# Altium PCB Fast_Servo.PCBDOC (part 3 of 11)
Units mm, origin at the board's own origin, x right, y up, seen from the top; angles counter-clockwise.
Board outline 162.48 x 100 mm, 6 copper layers (Top, GP1(GND), L3, L4, P3V3, Bot), stack 1.716 mm thick; 668 components, 491 nets, 2308 pads, 1133 vias.
Unrouted connection lines stored in the file: 2.
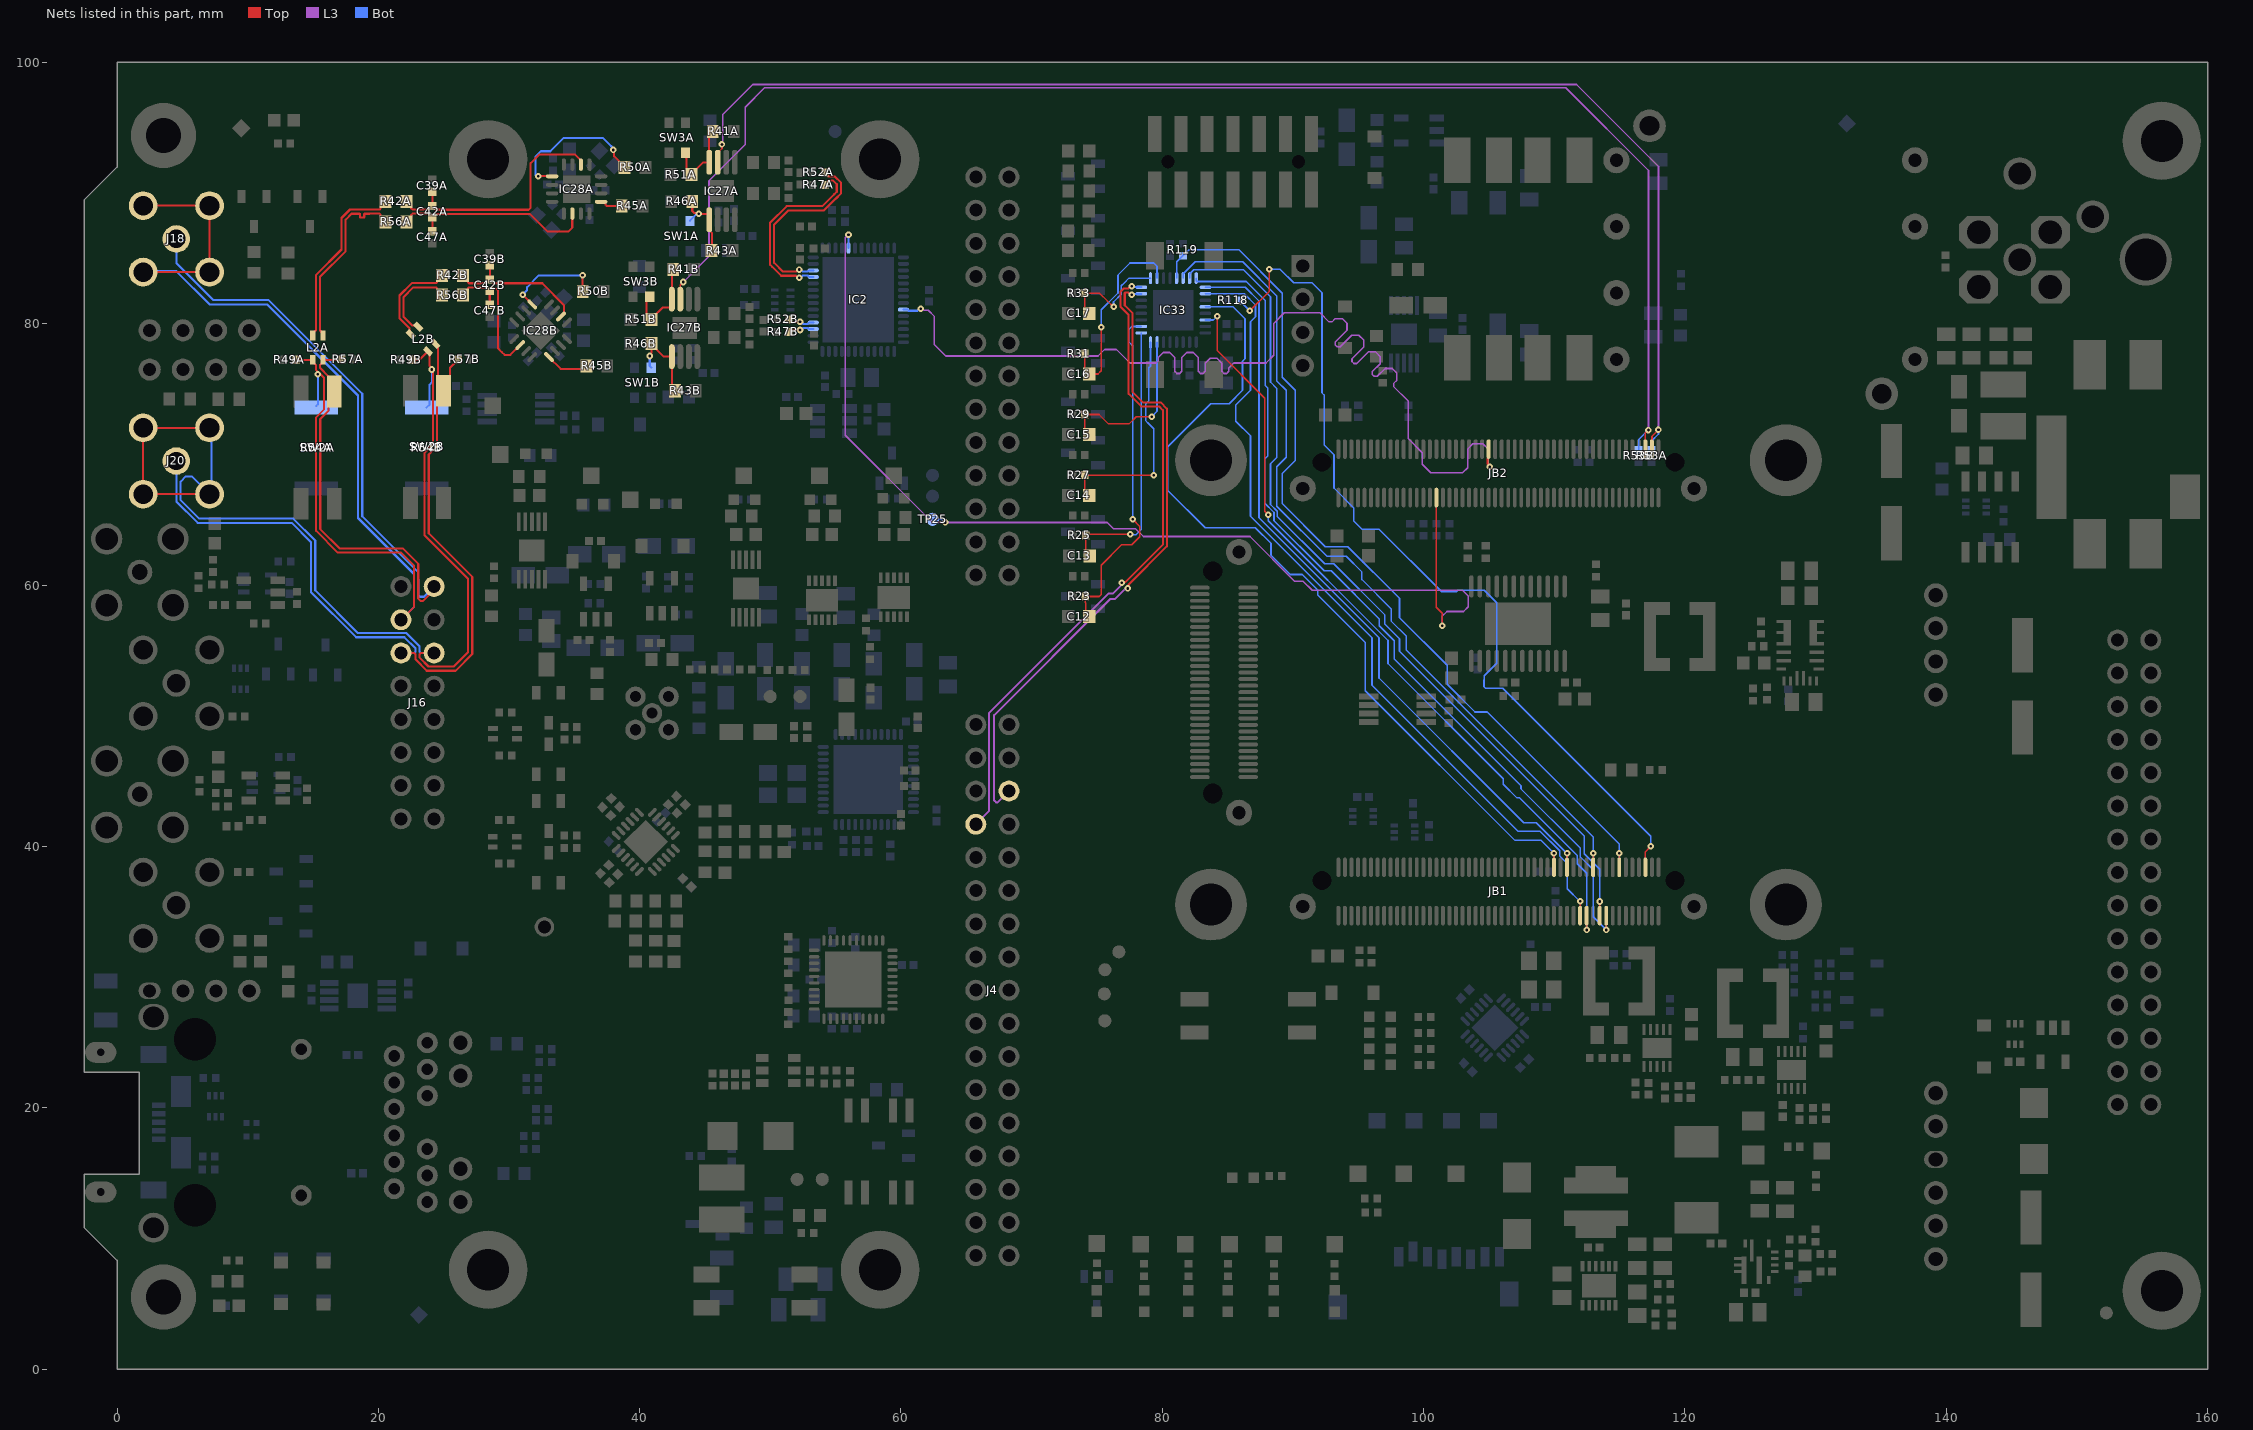
[diagram p7: the nets of this part, all layers, seen from the top]

## Part data (continued)
C22: library part CC0508_2.2UF_4V_20%_X7S_MURATA_LLA219C70G225M, "8 Terminals Low ESL Chip Multilayer Ceramic Capacitors for General Purpose", Case=0508, Manufacturer=MURATA, Manufacturer Part Number=LLA219C70G225MA01L, Tolerance=±20%, Voltage=4V, Author="CERN DEM BC", ComponentHeight=0.95mm, Component Type=Standard, CreateDate=07/07/2020, HelpURL=\\cern.ch\dfs\Applications\Altium\Datasheets\CC0508_X7S_MURATA_LLA219C70G225M.pdf, LatestRevisionDate=07/07/2020, Mounted=Yes, Part Description="8 Terminals Low ESL Chip Multilayer Ceramic Capacitors for General Purpose", Part Number=CC0508_2.2UF_4V_20%_X7S_MURATA_LLA219C70G225M, Pin Count=8, Sense=No, SMD=Yes, Socket=No, Status=None, TC=X7S
C25 C103 C104: library part CC0805_2.2UF_50V_10%_X7R, "Non-polarised capacitor", Case=0805, Manufacturer=GENERIC, Manufacturer1 ComponentHeight=1.40mm, Manufacturer1 Example=MURATA, Manufacturer1 Part Number=GRM21BR61H225KA73L, Tolerance=±10%, Voltage=50V, Author="CERN DEM JLC", Component Type=Standard, CreateDate=18/08/2014, HelpURL=\\cern.ch\dfs\Applications\Altium\Datasheets\CC0805_X7R_MURATA_GRM.pdf, LatestRevisionDate=18/08/2014, Manufacturer Part Number=CC0805_2.2UF_50V_10%_X7R, Mounted=Yes, Part Description="SMD Multilayer Chip Ceramic Capacitor", Part Number=CC0805_2.2UF_50V_10%_X7R, Pin Count=2, Sense=No, SMD=Yes, Socket=No, Status=Preferred, TC=X7R
C32 C34 C86 C89 C91 C93 C105 C128 C130 C131 C132 C187: library part CC0603_10UF_10V_10%_X5R, "Non-polarised capacitor", Case=0603, Manufacturer=GENERIC, Manufacturer1 ComponentHeight=0.8mm, Manufacturer1 Example=MURATA, Manufacturer1 Part Number=GRM188R61A106KE69D, Tolerance=±10%, Voltage=10V, Author="CERN DEM JLC", Component Type=Standard, HelpURL=\\cern.ch\dfs\Applications\Altium\Datasheets\CC0603_MURATA_GRM188R61A106KE69D.pdf, Manufacturer Part Number=CC0603_10UF_10V_10%_X5R, Mounted=Yes, Part Description="SMD Multilayer Chip Ceramic Capacitor", Part Number=CC0603_10UF_10V_10%_X5R, Pin Count=2, Sense=No, SMD=Yes, Socket=No, Status=None, TC=X5R
  C32 C34 C105 C128 C130 C131 C132 C187: CreateDate=31/01/2017, LatestRevisionDate=31/01/2017
  C86 C89 C91 C93: CreateDate=31-Jan-17, LatestRevisionDate=31-Jan-17
C39A C39B C47A C47B: library part CC0402_6.8PF_50V_0.1PF_NP0_JOHANSON_R07S, "Non-polarised capacitor", Case=0402, Manufacturer="JOHANSON TECHNOLOGY", Manufacturer Part Number=500R07S6R8BV4T, Tolerance=±0.1pF, Voltage=50V, Author="CERN DEM BC", ComponentHeight=0.61mm, Component Type=Standard, CreateDate=17-Nov-17, HelpURL=\\cern.ch\dfs\Applications\Altium\Datasheets\CC0402_NP0_JOHANSON_R07S.pdf, LatestRevisionDate=26-Sep-18, Mounted=Yes, Part Description="Ultra High-Q SMD Multilayer Capacitor", Part Number=CC0402_6.8PF_50V_0.1PF_NP0_JOHANSON_R07S, Pin Count=2, Sense=No, SMD=Yes, Socket=No, Status="Not Recommended", TC=C0G/NP0
C40A C40B C44A C44B: library part CC0603_2.2PF_50V_0.25PF_NP0, "Non-polarised capacitor", Case=0603, Manufacturer=GENERIC, Manufacturer1 ComponentHeight=0.87mm, Manufacturer1 Example=PHYCOMP, Manufacturer1 Part Number=223886715228, Tolerance=±0.25pF, Voltage=50V, Author="CERN DEM JLC", Component Type=Standard, CreateDate=03-Dec-07, HelpURL=\\cern.ch\dfs\Applications\Altium\Datasheets\CC0603_NP0_PHYCOMP.pdf, LatestRevisionDate=03-Dec-07, Manufacturer Part Number=CC0603_2.2PF_50V_0.25PF_NP0, Mounted=Yes, Part Description="SMD Multilayer Chip Ceramic Capacitor", Part Number=CC0603_2.2PF_50V_0.25PF_NP0, Pin Count=2, Sense=No, SMD=Yes, Socket=No, Status=Preferred, TC=C0G/NP0
C41A C41B C43A C43B C45A C45B C49A C49B: library part CC0402_100PF_50V_2%_C0G, "Non-polarised capacitor", Case=0402, Manufacturer=GENERIC, Manufacturer1 ComponentHeight=0.55mm, Manufacturer1 Example=KEMET, Manufacturer1 Part Number=C0402C101G5GAC, Manufacturer Part Number=CC0402_100PF_50V_5%_C0G, Tolerance=±2%, Voltage=50V, Author="CERN DEM BC", Component Type=Standard, CreateDate=15.06.2020, HelpURL="\\cern.ch\dfs\Applications\Altium\Datasheets\CC0402_C0G_KEMET_(Commercial Grade).pdf", LatestRevisionDate=15.06.2020, Mounted=Yes, Part Description="SMD Multilayer Chip Ceramic Capacitor", Part Number=CC0402_100PF_50V_2%_C0G, Pin Count=2, Sense=No, SMD=Yes, Socket=No, Status=Preferred, TC=C0G/NP0
C42A C42B: library part CC0402_1PF_50V_0.25PF_C0G, "Non-polarised capacitor", Case=0402, Manufacturer=GENERIC, Manufacturer1 ComponentHeight=0.55mm, Manufacturer1 Example=KEMET, Manufacturer1 Part Number=C0402C109C5GACTU, Tolerance=±0.25pF, Voltage=50V, Author="CERN DEM JLC", Component Type=Standard, CreateDate=03-Dec-07, HelpURL="\\cern.ch\dfs\Applications\Altium\Datasheets\CC0805_C0G_KEMET_(Commercial Grade).pdf", LatestRevisionDate=22-Apr-15, Manufacturer Part Number=CC0402_1PF_50V_0.25PF_C0G, Mounted=Yes, Part Description="SMD Multilayer Chip Ceramic Capacitor", Part Number=CC0402_1PF_50V_0.25PF_C0G, Pin Count=2, Sense=No, SMD=Yes, Socket=No, Status=Preferred, TC=C0G/NP0
C53 C55 C61 C63 C200: library part CC0603_33PF_50V_5%_NP0, "Non-polarised capacitor", Case=0603, Manufacturer=GENERIC, Manufacturer1 ComponentHeight=0.87mm, Manufacturer1 Example=PHYCOMP, Manufacturer1 Part Number=223886715339, Tolerance=±5%, Voltage=50V, Author="CERN DEM JLC", Component Type=Standard, HelpURL=\\cern.ch\dfs\Applications\Altium\Datasheets\CC0603_NP0_PHYCOMP.pdf, Manufacturer Part Number=CC0603_33PF_50V_5%_NP0, Mounted=Yes, Part Description="SMD Multilayer Chip Ceramic Capacitor", Part Number=CC0603_33PF_50V_5%_NP0, Pin Count=2, Sense=No, SMD=Yes, Socket=No, Status=Preferred, TC=C0G/NP0
  C53 C55 C61 C63: CreateDate=03-Dec-07, LatestRevisionDate=03-Dec-07
  C200: CreateDate=03.12.2007, LatestRevisionDate=03.12.2007
C69 C72 C74 C76 C82 C83: library part CC0603_NO-VALUE, "Non-polarised capacitor", Case=0603, Manufacturer1 ComponentHeight=0.9mm, Author="CERN DEM MR", Component Type=Standard, CreateDate=22.11.2016, HelpURL=Undefined, LatestRevisionDate=22.11.2016, Manufacturer=Undefined, Manufacturer Part Number=CC0603_NO-VALUE, Mounted=No, Part Description="Reserved Footprint For 0603(1608) Chip Ceramic Capacitor", Part Number=CC0603_NO-VALUE, Pin Count=2, Sense=No, SMD=Yes, Socket=No, Status=None
C81 C124 C125: library part CAE830-620_220UF_16V_20%, "Polarised capacitor", Case=E, Manufacturer=PANASONIC, Manufacturer Part Number=EEEFK1C221AP, Tolerance=±20%, Voltage=16V, Author="CERN DEM JLC", ComponentHeight=6.2mm, Component Type=Standard, CreateDate=03.12.2007, HelpURL=\\cern.ch\dfs\Applications\Altium\Datasheets\CAE_PANASONIC_FK.pdf, LatestRevisionDate=05.11.2014, Mounted=Yes, Part Description="Aluminum Electrolytic SMT Capacitor", Part Number=CAE830-620_220UF_16V_20%, Pin Count=2, Sense=No, SMD=Yes, Socket=No, Status="Not Recommended"
C100 C101 C109 C135 C138 C139 C143 C147 C165 C166 C169 C171 C179 C181 C182: library part CTE3216-18_10UF_16V_20%_AVX_TCJ, "Polarised capacitor", Case=A, Manufacturer=AVX, Manufacturer Part Number=TCJA106M016R0200, Tolerance=±20%, Voltage=16V, Author="CERN DEM JLC", ComponentHeight=1.8mm, Component Type=Standard, CreateDate=29.03.2012, HelpURL=\\cern.ch\dfs\Applications\Altium\Datasheets\CTE_AVX_TCJ.pdf, LatestRevisionDate=29.03.2012, Mounted=Yes, Part Description="ESR 0R200 Tantalum Solid Electrolytic Chip Capacitor with Conductive Polymer Electrode", Part Number=CTE3216-18_10UF_16V_20%_AVX_TCJ, Pin Count=2, Sense=No, SMD=Yes, Socket=No, Status=Preferred
C106 C107 C108 C111 C112 C116 C118 C119 C120 C126 C134 C142 C146 C163 C164 C167 C168 C172 C173 C174 C175 C176 C177 C178 C192 C193 C199: library part CC0805_22UF_16V_10%_X5R, "Non-polarised capacitor", Case=0805, Manufacturer=GENERIC, Manufacturer1 ComponentHeight=1.35mm, Manufacturer1 Example=TDK, Manufacturer1 Part Number=C2012X5R1C226KT, Tolerance=±10%, Voltage=16V, Author="CERN DEM JLC", Component Type=Standard, HelpURL=\\cern.ch\dfs\Applications\Altium\Datasheets\CC0805_X5R_TDK_C.pdf, Manufacturer Part Number=CC0805_22UF_16V_10%_X5R, Mounted=Yes, Part Description="SMD Multilayer Chip Ceramic Capacitor", Part Number=CC0805_22UF_16V_10%_X5R, Pin Count=2, Sense=No, SMD=Yes, Socket=No, Status=Preferred, TC=X5R
  C106 C107 C108 C111 C112 C116 C120 C126 C134 C142 C146 C163 C164 C167 C168 C172 C173 C174 C175 C176 C177 C178 C192 C193 C199: CreateDate=25.10.2012, LatestRevisionDate=25.10.2012
  C118 C119: CreateDate=25-Oct-12, LatestRevisionDate=25-Oct-12
C110 C136 C144 C148 C155 C162: library part CTE3216-18_22UF_10V_10%, "Polarised capacitor", Case=A, Manufacturer=GENERIC, Manufacturer1 ComponentHeight=1.8mm, Manufacturer1 Example=AVX, Manufacturer1 Part Number=TAJA226K010R, Tolerance=±10%, Voltage=10V, Author="CERN DEM JLC", Component Type=Standard, HelpURL=\\cern.ch\dfs\Applications\Altium\Datasheets\CTE_AVX_TAJ.pdf, Manufacturer Part Number=CTE3216-18_22UF_10V_10%, Mounted=Yes, Part Description="Solid Tantalum Chip Capacitor", Part Number=CTE3216-18_22UF_10V_10%, Pin Count=2, Sense=No, SMD=Yes, Socket=No, Status=Preferred
  C110 C136 C144 C148: CreateDate=03/12/2007, LatestRevisionDate=03/12/2007
  C155 C162: CreateDate=03.12.2007, LatestRevisionDate=03.12.2007
C114 C184 C185 C194 C195 C201: library part CC0402_1.5NF_50V_5%_C0G, "Non-polarised capacitor", Case=0402, Manufacturer=GENERIC, Manufacturer1 ComponentHeight=0.55mm, Manufacturer1 Example=KEMET, Manufacturer1 Part Number=C0402C152J5GACTU, Tolerance=±5%, Voltage=50V, Author="CERN DEM BC", Component Type=Standard, CreateDate=02.09.2019, HelpURL="\\cern.ch\dfs\Applications\Altium\Datasheets\CC0402_C0G_KEMET_(Commercial Grade).pdf", LatestRevisionDate=02.09.2019, Manufacturer Part Number=CC0402_1.5NF_50V_5%_C0G, Mounted=Yes, Part Description="SMD Multilayer Chip Ceramic Capacitor", Part Number=CC0402_1.5NF_50V_5%_C0G, Pin Count=2, Sense=No, SMD=Yes, Socket=No, Status=Preferred, TC=C0G/NP0
C122 C123 C127: library part CAP_SMD_1206_4.7n_500V, "Non-polarised capacitor", Case=1206, Manufacturer=GENERIC, Manufacturer1 ComponentHeight=1.7mm, Manufacturer1 Example=KEMET, Manufacturer1 Part Number=C1206C472KCRACTU, Manufacturer Part Number=CC1206_4.7NF_500V_10%_X7R, Tolerance=±10%, Voltage=500V, Author=GK, Component Type=Standard, CreateDate=2007-12-03, HelpURL=\\cern.ch\dfs\Applications\Altium\Datasheets\CC1206_X7R_VISHAY_VJ.pdf, LatestRevisionDate=2007-12-03, Mounted=Yes, Part Description="SMD Multilayer Chip Ceramic Capacitor", Part Number=CC1206_4.7NF_500V_10%_X7R, Pin Count=2, SMD=Yes, Socket=No, Status=Preferred, Table="Capacitors SMD", TC=X7R
C186 C188 C196 C198: library part CC0402_150PF_50V_5%_C0G, "Non-polarised capacitor", Case=0402, Manufacturer=GENERIC, Manufacturer1 ComponentHeight=0.55mm, Manufacturer1 Example=KEMET, Manufacturer1 Part Number=C0402C151J5GACTU, Tolerance=±5%, Voltage=50V, Author="CERN DEM JLC", Component Type=Standard, CreateDate=03.12.2007, HelpURL="\\cern.ch\dfs\Applications\Altium\Datasheets\CC0402_C0G_KEMET_(Commercial Grade).pdf", LatestRevisionDate=22.04.2015, Manufacturer Part Number=CC0402_150PF_50V_5%_C0G, Mounted=Yes, Part Description="SMD Multilayer Chip Ceramic Capacitor", Part Number=CC0402_150PF_50V_5%_C0G, Pin Count=2, Sense=No, SMD=Yes, Socket=No, Status=Preferred, TC=C0G/NP0
D1 D2 D3 D4 D5 D6 D7 D8 D9 D10 D11 D12: "Serial Diode", Case=SOT23-3, Manufacturer="NXP SEMICONDUCTORS", Power=250mW, Voltage=75V, Author="CERN DEM JMW", Bonding=No, ComponentHeight=1.1mm, Component Type=Standard, CreateDate=2008-11-21, Device=BAV199, HelpURL=\\cern.ch\dfs\Applications\Altium\Datasheets\BAV199.pdf, LatestRevisionDate=2008-11-21, Manufacturer Part Number=BAV199, Mounted=Yes, PackageDescription="SOT23 3-Leads, Pitch 0.95mm - Body 1.4x3mm, IPC Medium Density", Part Description="Low-Leakage Double Diode", Part Number=BAV199, Pin Count=3, PressFit=No, Sense=No, SMD=Yes, Socket=No
D13 D16 D17 D21 D22: Manufacturer="ON SEMICONDUCTOR", Voltage=5.5V, Author="CERN DEM JLC", Bonding=No, Component Type=Standard, ComponentHeight=1.75mm, CreateDate=05.12.2012, Device=NUP4114UPXV6T1G, HelpURL=\\cern.ch\dfs\Applications\Altium\Datasheets\NUP4114UPXV6T1G.pdf, LatestRevisionDate=05.12.2012, Manufacturer Part Number=NUP4114UPXV6T1G, Mounted=Yes, PackageDescription="SOTFL (SOT666, SOT563,), 0.50mm, Pitch; 6 Pin, 1.20mm W X 1.60mm L X 0.60mm H Body, IPC Medium Density", Part Description="ESD Protection Diodes Array (8kV) with Low Clamping Voltage", Part Number=NUP4114UPXV6T1G, Pin Count=8, PressFit=No, Sense=No, SMD=Yes, Socket=No
D14 D15 D19 D20 D24 D26 D27 D28 D29 D30 D31 D32: "Schottky Diode", Case=SOD-123FL, Manufacturer="NXP SEMICONDUCTORS", Power=2A, Voltage=60V, Author="CERN DEM JMW", Bonding=No, Component Type=Standard, ComponentHeight=1.1mm, CreateDate=19.06.2014, Device=PMEG6020ER, HelpURL=\\cern.ch\dfs\Applications\Altium\Datasheets\PMEG6020ER.pdf, LatestRevisionDate=19.06.2014, Manufacturer Part Number=PMEG6020ER, Mounted=Yes, PackageDescription="SODFL Diode (SOD123W); 2.60mm W X 1.70mm L X 1.10mm H body, IPC Medium Density", Part Description="MEGA Schottky Barrier Rectifier", Part Number=PMEG6020ER, Pin Count=2, PressFit=No, Sense=No, SMD=Yes, Socket=No
D18: "Zener Diode", Case=DO-214AA, Manufacturer="FAIRCHILD SEMICONDUCTOR", Power=600W, Voltage=60V, Author="CERN DEM JLC", Bonding=No, ComponentHeight=2.65mm, Component Type=Standard, CreateDate=30.06.2008, Device=SMBJ60A, HelpURL=\\cern.ch\dfs\Applications\Altium\Datasheets\SMBJ.pdf, LatestRevisionDate=19.12.2011, Manufacturer Part Number=SMBJ60A, Mounted=Yes, PackageDescription="DO-214-AA/SMB Diode, Molded Body; 5.34mm L X 3.625mm W X 2.65mm H, IPC Medium Density", Part Description="Uni-Directional Transient Voltage Suppressor Diode", Part Number=SMBJ60A, Pin Count=2, PressFit=No, Sense=No, SMD=Yes, Socket=No
D23: "Zener Diode", Case=DO-214AA, Manufacturer="FAIRCHILD SEMICONDUCTOR", Power=600W, Voltage=15V, Author="CERN DEM JLC", Bonding=No, ComponentHeight=2.65mm, Component Type=Standard, CreateDate=08.12.2008, Device=SMBJ15A, HelpURL=\\cern.ch\dfs\Applications\Altium\Datasheets\SMBJ.pdf, LatestRevisionDate=19.12.2011, Manufacturer Part Number=SMBJ15A, Mounted=Yes, PackageDescription="DO-214-AA/SMB Diode, Molded Body; 5.34mm L X 3.625mm W X 2.65mm H, IPC Medium Density", Part Description="Uni-Directional Transient Voltage Suppressor Diode", Part Number=SMBJ15A, Pin Count=2, PressFit=No, Sense=No, SMD=Yes, Socket=No
D25: library part SMBJ5V0A, "Zener Diode", Case=DO-214AA, Manufacturer=DIODES, Power=600W, Voltage=5V, Author=GK, Bonding=No, Component Type=Standard, ComponentHeight=2.65mm, CreateDate=08-Dec-08, Device=SMBJ5.0A, HelpURL=\\cern.ch\dfs\Applications\Altium\Datasheets\SMBJ.pdf, LatestRevisionDate=19-Dec-11, Manufacturer Part Number=SMBJ5.0A, Mounted=Yes, PackageDescription="DO-214-AA/SMB Diode, Molded Body; 5.34mm L X 3.625mm W X 2.65mm H, IPC Medium Density", Part Description="Uni-Directional Transient Voltage Suppressor Diode", Part Number=SMBJ5.0A, Pin Count=2, PressFit=No, Sense=No, SMD=Yes, Socket=No
FL1: library part FIL_MURATA_BNX022-01L, "Block Type EMIFIL (LC Combined)", Manufacturer=MURATA, Manufacturer Part Number=BNX022-01L, Resistance=0.5R, Author="CERN DEM JLC", ComponentHeight=3.3mm, Component Type=Standard, CreateDate=10.10.2012, HelpURL=\\cern.ch\dfs\Applications\Altium\Datasheets\FIL_MURATA_BNX022-01L.pdf, LatestRevisionDate=10.10.2012, Mounted=Yes, Part Description="Block Type EMIFIL (LC Combined) SMD Type, BNX02* Series", Part Number=FIL_MURATA_BNX022-01L, Pin Count=2, Sense=No, SMD=Yes, Socket=No, Status=None
FTG1: library part FIDUCIAL_TARGET_C100-200, "Fiducial Target", Author="CERN DEM JLC", ComponentHeight=0mm, Component Type="Standard (No BOM)", CreateDate=09.02.2010, Family=Fiducial, HelpURL=Undefined, LatestRevisionDate=04.04.2012, Mounted=No, PackageDescription="Round Fiducial Target, Top Layer, 1.0mm, Top Solder 2.0mm, Keepout =2.0mm", Part Description="Round Fiducial Target, Top Layer, 1.0mm, Top Solder 2.0mm, Keepout =2.0mm", Part Number=FIDUCIAL_TARGET_C100-200, Pin Count=1, Sense=No, SMD=Yes, Socket=No, Status=None
FTG2 FTG3 FTG4: library part FIDUCIAL_TARGET_S100-200, "Fiducial Target", Author="CERN DEM JLC", ComponentHeight=0mm, Component Type="Standard (No BOM)", CreateDate=09.02.2010, Family=Fiducial, HelpURL=Undefined, LatestRevisionDate=04.04.2012, Mounted=No, PackageDescription="Square Fiducial Target, Top Layer, 1.0mm, Top Solder 2.0mm, Keepout =2.0mm", Part Description="Square Fiducial Target, Top Layer, 1.0mm, Top Solder 2.0mm, Keepout =2.0mm", Part Number=FIDUCIAL_TARGET_S100-200, Pin Count=1, Sense=No, SMD=Yes, Socket=No, Status=None
IC1: "One Channel, Current-Limited, Power-Distribution Switches", Case=SSOP8, Manufacturer="TEXAS INSTRUMENTS", Author="CERN DEM BC", Bonding=No, ComponentHeight=1.1mm, Component Type=Standard, CreateDate=06/07/2020, Device=TPS2051BDGN, HelpURL=\\cern.ch\dfs\Applications\Altium\Datasheets\TPS2051BDGN.pdf, LatestRevisionDate=06/07/2020, Manufacturer Part Number=TPS2051BDGN, Mounted=Yes, PackageDescription="SOP, 0.65mm Pitch; 8 Pin, 3.00mm W X 3.00mm L X 1.10mm H body (w/Thermal Tab 1.57 X 1.89mm), IPC Medium Density", Part Description="One Channel, Current-Limited (500mA), Power-Distribution Switches", Part Number=TPS2051BDGN, Pin Count=8, PressFit=No, Sense=No, SMD=Yes, Socket=No
IC2: "16-Bit, 125Msps Low Power Dual ADCs", Case=QFN52, Manufacturer="ANALOG DEVICES", Author="CERN DEM BC", Bonding=No, ComponentHeight=0.8mm, Component Type=Standard, CreateDate=06/07/2020, Device=LTC2195CUKG, HelpURL=\\cern.ch\dfs\Applications\Altium\Datasheets\LTC2195CUKG.pdf, LatestRevisionDate=06/07/2020, Manufacturer Part Number=LTC2195CUKG, Mounted=Yes, PackageDescription="QFN, 0.50mm Pitch, Rect.; 12 pin X 14 Pin, 7.00mm L X 8.00mm W X 0.80mm H body (w/Thermal Tab 6.55 X 5.50mm), IPC Medium Density", Part Description="16-Bit, 125Msps Low Power Dual ADCs", Part Number=LTC2195CUKG, Pin Count=53, PressFit=No, Sense=No, SMD=Yes, Socket=No
IC3: "Ultralow Noise Drivers For Low Voltage ADCs", Case=QFN24, Manufacturer="ANALOG DEVICES", Author="CERN DEM MR", Bonding=No, ComponentHeight=0.8mm, Component Type=Standard, CreateDate=23/11/2016, Device=ADA4930-2YCPZ, HelpURL=\\cern.ch\dfs\Applications\Altium\Datasheets\ADA4930-2YCPZ.pdf, LatestRevisionDate=23/11/2016, Manufacturer Part Number=ADA4930-2YCPZ, Mounted=Yes, PackageDescription="QFN, 0.50mm Pitch, Square; 24 Pin, 4.00mm L X 4.00mm W X 0.80mm H body (w/Thermal Tab 2.40 X 2.40mm), IPC Medium Density", Part Description="Ultralow Noise Drivers For Low Voltage ADCs", Part Number=ADA4930-2YCPZ, Pin Count=25, PressFit=No, Sense=No, SMD=Yes, Socket=No
IC4 IC29: "Single Bus Buffer Gate With 3-State Output", Case=SOT23-5, Manufacturer=DIODES, Author=GK, Bonding=No, Component Type=Standard, ComponentHeight=1.45mm, CreateDate=18.05.2016, Device=74LVC1G125W5-7, HelpURL=\\cern.ch\dfs\Applications\Altium\Datasheets\SN74AHC1G125DBV.pdf, LatestRevisionDate=18.05.2016, Manufacturer Part Number=74LVC1G125W5-7, Mounted=Yes, PackageDescription="SOT, 0.95mm Pitch; 5 Pin, 1.60mm W X 2.90mm L X 1.45mm H body, IPC Medium Density", Part Description="Single Bus Buffer Gate With 3-State Output", Part Number=74LVC1G125W5-7, Pin Count=5, PressFit=No, Sense=No, SMD=Yes, Socket=No
IC5 IC30: "Single Schmitt-Trigger Inverter", Case=SOT353, Manufacturer="NXP SEMICONDUCTORS", Author="CERN DEM JLC", Bonding=No, Component Type=Standard, ComponentHeight=1.1mm, CreateDate=04.07.2012, Device=74LVC1G14GW, HelpURL=\\cern.ch\dfs\Applications\Altium\Datasheets\74LVC1G14GW.pdf, LatestRevisionDate=04.07.2012, Manufacturer Part Number=74LVC1G14GW, Mounted=Yes, PackageDescription="SOT353, SC70-5, 0.65mm Pitch; 5 Pin, 1.25mm W X 2.05mm L X 1.10mm H body, IPC Medium Density", Part Description="Single Schmitt-trigger inverter", Part Number=74LVC1G14GW, Pin Count=4, PressFit=No, Sense=No, SMD=Yes, Socket=No
IC6: "SDIO Port Expander With Voltage-Level Translation", Case=QFN24, Manufacturer="TEXAS INSTRUMENTS", Author="CERN DEM JLC", Bonding=No, ComponentHeight=0.8mm, Component Type=Standard, CreateDate=19-Nov-14, Device=TXS02612RTWR, HelpURL=\\cern.ch\dfs\Applications\Altium\Datasheets\TXS02612RTWR.pdf, LatestRevisionDate=19-Nov-14, Manufacturer Part Number=TXS02612RTWR, Mounted=Yes, PackageDescription="QFN, 0.50mm Pitch, Square; 6 Pin X 6 Pin, 4mm X 4mm Body (w/Thermal Tab 2.55 X 2.55 mm), IPC Medium Density", Part Description="SDIO Port Expander With Voltage-Level Translation", Part Number=TXS02612RTWR, Pin Count=25, PressFit=No, Sense=No, SMD=Yes, Socket=No
IC7: "1.7V-5.5V, 2K I2C Serial EEPROM With EUI-48 Node Identity", Case=SOT23-5, Manufacturer="MICROCHIP TECHNOLOGY", Author="CERN DEM MR", Bonding=No, ComponentHeight=1.45mm, Component Type=Standard, CreateDate=31.03.2016, Device=24AA02E48T-I/OT, HelpURL=\\cern.ch\dfs\Applications\Altium\Datasheets\24AA02E48T-I-OT.pdf, LatestRevisionDate=31.03.2016, Manufacturer Part Number=24AA02E48T-I/OT, Mounted=Yes, PackageDescription="SOT, 0.95mm pitch; 5 pin, 1.60mm W X 2.90mm L X 1.45mm H body, IPC Medium Density", Part Description="1.7V-5.5V, 2K I2C Serial EEPROM With EUI-48 Node Identity", Part Number=24AA02E48T-I/OT, Pin Count=5, PressFit=No, Sense=No, SMD=Yes, Socket=No
IC8 IC17 IC23: "200mA, Low Noise, Low Dropout Negative Micropower Regulator", Case=SOT23-5, Manufacturer="LINEAR TECHNOLOGY", Author="CERN DEM JLC", Bonding=No, ComponentHeight=1mm, Component Type=Standard, CreateDate=05.05.2009, Device=LT1964ES5-SD#TRMPBF, HelpURL=\\cern.ch\dfs\Applications\Altium\Datasheets\LT1964ES5-SD#TRMPBF.pdf, LatestRevisionDate=05.05.2009, Manufacturer Part Number=LT1964ES5-SD#TRMPBF, Mounted=Yes, PackageDescription="SOT23, 0.95mm pitch; 5 pin, 1.75mm W X 3.00mm L, IPC Medium Density", Part Description="-1.22V to -20V, 200mA, Low Noise, Low Dropout Negative Micropower Regulator", Part Number=LT1964ES5-SD#TRMPBF, Pin Count=5, PressFit=No, Sense=No, SMD=Yes, Socket=No
IC9 IC19 IC21: "20V, 200mA, Ultralow Noise, Ultrahigh PSRR RF Linear Regulator", Case=MSOP10, Manufacturer="LINEAR TECHNOLOGY", Author="CERN DEM MR", Bonding=No, ComponentHeight=1.1mm, Component Type=Standard, CreateDate=09.06.2016, Device=LT3042EMSE#PBF, HelpURL=\\cern.ch\dfs\Applications\Altium\Datasheets\LT3042EMSE#PBF.pdf, LatestRevisionDate=09.06.2016, Manufacturer Part Number=LT3042EMSE#PBF, Mounted=Yes, PackageDescription="SOP, 0.50mm, Pitch; 10 pin, 3.00mm W X 3.00mm L X 1.10mm H body (w/thermal tab  1.68 X 1.98 mm), IPC Medium Density", Part Description="20V, 200mA, Ultralow Noise, Ultrahigh PSRR RF Linear Regulator", Part Number=LT3042EMSE#PBF, Pin Count=11, PressFit=No, Sense=No, SMD=Yes, Socket=No
IC10: "2.8V to 5.5V Input, 4A, Power Module Synchronous Step-Down Converter with Integrated Inductor", Case=QFN20, Manufacturer="MPS (MONOLITIC  POWER SYSTEMS)", Author="CERN DEM BC", Bonding=No, Component Type=Standard, ComponentHeight=1.65mm, CreateDate=23.11.2020, Device=MPM3840GQV, HelpURL=\\cern.ch\dfs\Applications\Altium\Datasheets\MPM3840GQV.pdf, LatestRevisionDate=23.11.2020, Manufacturer Part Number=MPM3840GQV, Mounted=Yes, PackageDescription="MPS QFN-20 Case, 0.50mm Pitch, Rect.; 18 Pin, 3.00mm L X 5.00mm W X 1.65mm H body, (w/Thermal Tab x2)", Part Description="2.8V to 5.5V Input, 4A, Power Module Synchronous Step-Down Converter with Integrated Inductor", Part Number=MPM3840GQV, Pin Count=20, PressFit=No, Sense=No, SMD=Yes, Socket=No
IC11: "4.5V to 28V Input, 6A Synchronous Buck Converter", Manufacturer="TEXAS INSTRUMENTS", Author="CERN DEM BC", Bonding=No, ComponentHeight=1mm, Component Type=Standard, CreateDate=06/07/2020, Device=TPS56637RPA, HelpURL=\\cern.ch\dfs\Applications\Altium\Datasheets\TPS56637RPA.pdf, LatestRevisionDate=06/07/2020, Manufacturer Part Number=TPS56637RPA, Mounted=Yes, PackageDescription="TEXAS Case Style RPA0010A, QFN, 0.50mm Pitch; 10 Pin, 3.00mm W X3.00mm L X 1.00mm H body", Part Description="4.5V to 28V Input, 6A Synchronous Buck Converter", Part Number=TPS56637RPA, Pin Count=10, PressFit=No, Sense=No, SMD=Yes, Socket=No
IC12: library part AG5300, "Power-over-Ethernet Plus (POE+) Module", Manufacturer=SILVERTEL, Author="CERN DEM JLC", Bonding=No, Component Type=Standard, ComponentHeight=14mm, CreateDate=20.03.2018, Device=AG5300/AG5412, HelpURL=\\cern.ch\dfs\Applications\Altium\Datasheets\AG5300.pdf, LatestRevisionDate=20.03.2018, Manufacturer Part Number=AG5300/AG5412, Mounted=Yes, PackageDescription="Power-over-Ethernet Plus (POE+) Module, Body L 57.3mm x W 18mm x H 14mm", Part Description="12V 30W Power-over-Ethernet Plus (POE+)", Part Number=AG5300/AG5412, Pin Count=10, PressFit=No, Sense=No, SMD=No, Socket=No
IC13 IC14: "Single Optocoupler", Case=SOIC4, Manufacturer=VISHAY, Part Number=TCMD1000-217-500E, Author=GK, Bonding=No, Component Type=Standard, ComponentHeight=2.42mm, CreateDate=11.11.2014, Device=TCMD1000, HelpURL=\\cern.ch\dfs\Applications\Altium\Datasheets\ACPL-217-500E.pdf, LatestRevisionDate=11.11.2014, Manufacturer Part Number=TCMD1000, Mounted=Yes, PackageDescription="SOIC, 1.27mm, pitch; 4 pin, 2.60mm W X 4.40mm L X 2.42mm H body, IPC Medium Density", Part Description="DC Input, Half-Pitch Phototransistor Optocoupler", Pin Count=4, PressFit=No, Sense=No, SMD=Yes, Socket=No, Status="Not Recommended"
IC15: "4.5V to 60V, 1A High-Efficiency, Synchronous, Inverting Output DC-DC Converters", Case=SON12, Manufacturer=MAXIM, Author="CERN DEM HF", Bonding=No, Component Type=Standard, ComponentHeight=0.8mm, CreateDate=22.10.2021, Device=MAX17577ATC+, HelpURL=\\cern.ch\dfs\Applications\Altium\Datasheets\MAX17577ATC+.pdf, LatestRevisionDate=22.10.2021, Manufacturer Part Number=MAX17577ATC+, Mounted=Yes, PackageDescription="SON, 0.50mm Pitch, 12-Pin, 3.00mm W  X 3.00mm L X 0.80mm H body, (w/Thermal Tab 1.80 X 2.60mm), IPC Medium Density", Part Description="4.5V to 60V, 1A High-Efficiency, Synchronous, Inverting Output DC-DC Converters", Part Number=MAX17577ATC+, Pin Count=13, PressFit=No, Sense=No, SMD=Yes, Socket=No
IC16 IC18: "20V, 500mA, Ultralow Noise, Ultrahigh PSRR Linear Regulator", Case=SON10, Manufacturer="LINEAR TECHNOLOGY", Author="CERN DEM JLC", Bonding=No, ComponentHeight=0.8mm, Component Type=Standard, CreateDate=07/12/2016, Device=LT3045EDD#PBF, HelpURL=\\cern.ch\dfs\Applications\Altium\Datasheets\LT3045EDD#PBF.pdf, LatestRevisionDate=07/12/2016, Manufacturer Part Number=LT3045EDD#PBF, Mounted=Yes, PackageDescription="SON, 0.50mm Pitch; 10 Pin, 3.00mm W X 3.00mm L X 0.80mm H body (w/Thermal Tab 1.75 X 2.48 mm), IPC Medium Density", Part Description="20V, 500mA, Ultralow Noise, Ultrahigh PSRR Linear Regulator", Part Number=LT3045EDD#PBF, Pin Count=11, PressFit=No, Sense=No, SMD=Yes, Socket=No
IC20: "Low-Jitter, 10 or 4-Output, Any-Frequency, Any-Output Clock Generator", Case=QFN44, Manufacturer="SILICON LABS", Author="CERN DEM JLC", Bonding=No, ComponentHeight=0.9mm, Component Type=Standard, CreateDate=14-Dec-17, Device=SI5340B-D-GM, HelpURL=\\cern.ch\dfs\Applications\Altium\Datasheets\SI5340B-D-GM.pdf, LatestRevisionDate=14-Dec-17, Manufacturer Part Number=SI5340B-D-GM, Mounted=Yes, PackageDescription="QFN,0.50mm Pitch, Square; 44 Pin, 7.00mm L X 7.00mm W X 0.90mm H Body (W/Thermal Tab 5.3mm X 5.3mm), IPC Medium Density", Part Description="Low-Jitter, 10 or 4-Output, Any-Frequency, Any-Output Clock Generator", Part Number=SI5340B-D-GM, Pin Count=45, PressFit=No, Sense=No, SMD=Yes, Socket=No
IC22: library part DC/DC_CC6-1212DF-E, "CONV DC/DC 6W DUAL 12V +-12V PCB", Manufacturer="TDK-Lambda Americas Inc.", Author=GK, Bonding=No, ComponentHeight=10.45mm, Component Type=Standard, CreateDate=17.12.2016, Device=CC6-1212DF-E, LatestRevisionDate=17.12.2016, Manufacturer Part Number=CC6-1212DF-E, Mounted=Yes, PackageDescription="CC6 Series, Body 0.900 x 0.831 x 0.335, Regulated", Part Description="CONV DC/DC 6W DUAL 12V +-12V PCB", Part Number=CC6-1212DF-E, Pin Count=7, PressFit=No, Sense=No, SMD=No, Socket=No
IC24 IC25: library part PM_FAN8060, "2.5 to 5.5 V 1 A 1.2 MHz Step-Down DC/DC", Case=SON10, Manufacturer="ON SEMICONDUCTOR", Author=GK, Bonding=No, Component Type=Standard, ComponentHeight=0.8mm, CreateDate=22.10.2021, Device=FAN8060EMPX, HelpURL=\\cern.ch\dfs\Applications\Altium\Datasheets\FAN5354MPX.pdf, LatestRevisionDate=22.10.2021, Manufacturer Part Number=FAN8060EMPX, Mounted=Yes, PackageDescription="SON, 10-Leads, Body 3,00x3,00mm, Pitch 0,50mm, Thermal Pad 2,25x1,55mm, IPC Medium Density", Part Description="2.5 to 5.5 V 1 A 1.2 MHz Step-Down DC/DC", Part Number=FAN8060EMPX, Pin Count=13, PressFit=No, Sense=No, SMD=Yes, Socket=No
IC26: library part CMP-0784-00536-1, "Precision Series Sub-Band Gap Voltage Reference, 1 V Output, 2 to 18 V Supply, Industrial, 6-pin SOT23 (UJ-6), Reel", Manufacturer="Analog Devices", Operating Temp Range="-40 to 125 degC", Code_JEDEC=MO-193-AA, ComponentLink1Description="Manufacturer URL", ComponentLink1URL=http://www.analog.com/en/index.html, ComponentLink2Description=Datasheet, ComponentLink2URL=http://www.analog.com/static/imported-files/data_sheets/ADR130.pdf, ComponentLink3Description="Package Specification", ComponentLink3URL=http://www.analog.com/static/imported-files/packages/PKG_PDF/TSOT(UJ)/UJ_6.pdf, ComponentLink4Description="URL Link1", ComponentLink4URL="Product URL:http://www.analog.com/en/special-linear-functions/voltage-references/adr130/products/product.html", DatasheetVersion="Rev. B", Max V Supply (V)=18, Min V Supply (V)=2, Mounting Technology="Surface Mount", PackageDescription="6-Pin Thin Small Outline Transistor Package, Body 2.9 x 1.6 mm, Pitch 0.95 mm", PackageReference=UJ-6, PackageVersion=Dec-04, Packing=Reel, PartNumber=ADR130AUJZ-R2, Ref Out TC (ppm/C)=15, Vout="0.5V, 1V"
IC27A IC27B: library part CMP-0359-00998-2, "Single Channel, Low Noise, Differential Amplifier / Driver, RRI, 3000 MHz Typical GBW, 630 V/us Typical SR, 2.7 to 3.5 V, 8-Pin SOP (MS8E-8), Industrial, Pb-Free", Linear Technology Part Number=LTC6406, Manufacturer="Linear Technology", Channels (#)=1, ComponentLink1Description="Manufacturer URL", ComponentLink1URL=http://www.linear.com/, ComponentLink2Description=Datasheet, ComponentLink2URL=http://cds.linear.com/docs/en/datasheet/6406fc.pdf, ComponentLink3Description="Package Specification", ComponentLink3URL=http://cds.linear.com/docs/en/packaging/05081662_J_MS8E.pdf, DatasheetVersion="Rev. C", GBW (MHz) Typical=3000, Is (mA) Typical=18, Mounting Technology="Surface Mount", PackageDescription="8-Lead Plastic MSOP, Body 3.00 x 3.00 mm. Pitch 0.65 mm", PackageReference=LT-MS8E-8-EDP, PackageVersion="Rev J", PartNumber=LTC6406IMS8E#PBF, RevisionNote="URLs updated", RoHS=Pb-Free, SR (V/us) Typical=630, Type=DIFF, Vos (mV) Typical=1, Vs Max (V)=3.5, Vs Min (V)=2.7
IC28A IC28B: library part CMP-0384-02092-2, "Double Channel Low Noise Operational Amplifier, 1.05 GHz BW, 870 V/us SR, Industrial, 16-pin QFN (CP-16-4), Reel", Amplifiers Per Package=2, Generic Part Number=ADA4817-2, Input Bias Current=2pA, Input Offset Voltage=2mV, Manufacturer="Analog Devices", Code_JEDEC=MO-220-VGGC, ComponentLink1Description="Manufacturer URL", ComponentLink1URL=http://www.analog.com/en/index.html, ComponentLink2Description=Datasheet, ComponentLink2URL=http://www.analog.com/static/imported-files/data_sheets/ADA4817-1_4817-2.pdf, ComponentLink3Description="Package Specification", ComponentLink3URL=http://www.analog.com/static/imported-files/packages/46009454504174339653421710019CP_16_4.pdf, ComponentLink4Description="Reference Circuit", ComponentLink4URL=http://www.analog.com/en/all-operational-amplifiers-op-amps/operational-amplifiers-op-amps/ada4817-2/products/product.html#product-recommendations, DatasheetVersion="Rev. A", Iq/Amp=21mA, Mounting Technology="Surface Mount", PackageDescription="16-Pin Lead Frame Chip Scale Package, Body 4 x 4 mm, Pitch 0.65 mm", PackageReference=CP-16-4, PackageVersion=010606-0, PartNumber=ADA4817-2ACPZ-R7, RevisionNote="Reference Circuit URL fixed", Slew Rate=870V/us, Small Signal Bandwidth=1.05GHz, V Span Max=10V, V Span Min=5V
IC31: library part CMP-0318-00565-2, "Dual 14-Bit Low Power TxDAC Digital-to-Analog Converter, 0 to +70 degC, CP-40-1, Pb-Free, Tray", Generic Part Number=AD9117, Manufacturer="Analog Devices", # DAC Outputs=2, Code_JEDEC=MO-220-VJJD-2, ComponentLink1Description="Manufacturer URL", ComponentLink1URL=http://www.analog.com/en/index.html, ComponentLink2Description=Datasheet, ComponentLink2URL=http://www.analog.com/static/imported-files/data_sheets/AD9114_9115_9116_9117.pdf, ComponentLink3Description="Package Specification", ComponentLink3URL=http://www.analog.com/static/imported-files/packages/PKG_PDF/LFCSP(CP)/CP_40_1.pdf, ComponentLink4Description="Product URL", ComponentLink4URL=http://www.analog.com/en/digital-to-analog-converters/da-converters/ad9117/products/product.html, ComponentLink5Description="Reference Design URL", ComponentLink5URL=http://www.analog.com/en/digital-to-analog-converters/da-converters/ad9117/products/product.html#prod_cross_sell, DatasheetVersion=Rev.B, Max V+=3.3V, Mounting Technology="Surface Mount", PackageDescription="40-Pin Lead Frame Chip Scale Package [LFCSP_VQ] Very Thin Quad", PackageReference=CP-40-1, PackageVersion=Oct-2006, Packing=Tray, PartNumber=AD9117BCPZ, Resolution (Bits)=14, RevisionNote="Component URL fixed", RoHS=Y, Single Supply=Yes
IC32: library part CMP-0784-00538-1, "Precision, Micropower LDO Voltage Reference in TSOT, 1.25 V Output, 2.7 to 18 V Supply, Industrial, 6-pin SOT23 (UJ-6), Reel", Manufacturer="Analog Devices", Operating Temp Range="-40 to 125 degC", Code_JEDEC=MO-193-AA, ComponentLink1Description="Manufacturer URL", ComponentLink1URL=http://www.analog.com/en/index.html, ComponentLink2Description=Datasheet, ComponentLink2URL=http://www.analog.com/static/imported-files/data_sheets/ADR121_125_127.pdf, ComponentLink3Description="Package Specification", ComponentLink3URL=http://www.analog.com/static/imported-files/packages/PKG_PDF/TSOT(UJ)/UJ_6.pdf, ComponentLink4Description="URL Link1", ComponentLink4URL="Product URL:http://www.analog.com/en/special-linear-functions/voltage-references/adr127/products/product.html", DatasheetVersion="Rev. B", Max V Supply (V)=18, Min V Supply (V)=2.7, Mounting Technology="Surface Mount", PackageDescription="6-Pin Thin Small Outline Transistor Package, Body 2.9 x 1.6 mm, Pitch 0.95 mm", PackageReference=UJ-6, PackageVersion=Dec-04, Packing=Reel, PartNumber=ADR127AUJZ-REEL7, Ref Out TC (ppm/C)=15, Vout=1.25V
IC33: library part CMP-0313-00285-2, "1Dual 12-Bit SAR Analog-to-Digital Converter with Serial, SPI Interface, 2MSPS, -40 to +125 degC, CP-32-2, Pb-Free, Tray", Generic Part Number=AD7266, Manufacturer="Analog Devices", Channels=12, Code_JEDEC=MO-220-VHHD-2, ComponentLink1Description="Manufacturer URL", ComponentLink1URL=http://www.analog.com/en/index.html, ComponentLink2Description=Datasheet, ComponentLink2URL=http://www.analog.com/static/imported-files/data_sheets/AD7266.pdf, ComponentLink3Description="Package Specification", ComponentLink3URL=http://www.analog.com/static/imported-files/packages/414143737956480539664569CP_32_2.pdf, ComponentLink4Description="Product URL", ComponentLink4URL=http://www.analog.com/en/analog-to-digital-converters/ad-converters/ad7266/products/product.html, DatasheetVersion=Rev.B, Interface="Ser, SPI", Mounting Technology="Surface Mount", PackageDescription="32-Lead Lead Frame Chip Scale Package [LFCSP_VQ] 5 x 5 mm Body, Very Thin Quad", PackageReference=CP-32-2, PackageVersion=Jan-2005, Packing=Tray, PartNumber=AD7266BCPZ, Resolution (Bits)=12, RoHS=Y, Throughput Rate (SPS)=2M
IC34: library part CMP-0318-01660-2, "Dual 12-Bit Voltage Output Digital-to-Analog Converter with Serial Interface, -40 to +85 degC, RE-24, Pb-Free, Tube", Generic Part Number=AD5722R, Manufacturer="Analog Devices", # DAC Outputs=2, Code_JEDEC=MO-153-ADT, ComponentLink1Description="Manufacturer URL", ComponentLink1URL=http://www.analog.com/en/index.html, ComponentLink2Description=Datasheet, ComponentLink2URL=http://www.analog.com/static/imported-files/data_sheets/AD5722R_5732R_5752R.pdf, ComponentLink3Description="Package Specification", ComponentLink3URL=http://www.analog.com/static/imported-files/packages/PKG_PDF/TSSOP_EP(RE)/RE_24.pdf, ComponentLink4Description="Product URL", ComponentLink4URL=http://www.analog.com/en/digital-to-analog-converters/da-converters/ad5722r/products/product.html, ComponentLink5Description="Reference Design URL", ComponentLink5URL=http://www.analog.com/en/digital-to-analog-converters/da-converters/ad5722r/products/product.html#prod_cross_sell, DatasheetVersion=Rev.D, Max V+=16.5V, Mounting Technology="Surface Mount", Op Pwr Diss=190mW, PackageDescription="24-Lead Thin Shrink Small Outline Package, Exposed Pad [TSSOP_EP]", PackageReference=RE-24, PackageVersion=050806-A, Packing=Tube, PartNumber=AD5722RBREZ, Resolution (Bits)=12, RevisionNote="Component URL fixed", RoHS=Y, Settling Time=7.5Âµs, Single Supply=Yes
IC36 IC37: "Digital Temperature Sensor and Thermal Watchdog with Two-Wire Interface", Case=SSOP8, Manufacturer="TEXAS INSTRUMENTS", Author="CERN DEM JLC", Bonding=No, Component Type=Standard, ComponentHeight=1.09mm, CreateDate=15.10.2012, Device=LM75AIMM/NOPB, HelpURL=\\cern.ch\dfs\Applications\Altium\Datasheets\LM75AIMM-NOPB.pdf, LatestRevisionDate=15.10.2012, Manufacturer Part Number=LM75AIMM/NOPB, Mounted=Yes, PackageDescription="SOP, 0.65mm pitch; 8 pin,3.00mm W X 3.00mm L X 1.09mm H bodyI, PC Medium Density", Part Description="-25° to +100°C ±2°C Digital Temperature Sensor and Thermal Watchdog with Two-Wire Interface", Part Number=LM75AIMM/NOPB, Pin Count=8, PressFit=No, Sense=No, SMD=Yes, Socket=No
J1: library part CON_USB_UJ2-MIBH-4-MSMT, "5 Pin + 1 Shield  in-line USB Receptacle", Manufacturer=CUI, Manufacturer Part Number=UJ2-MIBH-4-MSMT, Part Number=CUI_UJ2-MIBH-4-MSMT, Author=GK, ComponentHeight=1.1, Component Type=Standard, CreateDate=13/12/2017, Family=USB, HelpURL=\\cern.ch\dfs\Applications\Altium\Datasheets\MOLEX_105133-0011.pdf, LatestRevisionDate=13/12/2017, Mounted=Yes, Part Description="0.65mm Pitch, Micro-USB Type B Surface Mounte Vertical Receptacle", Pin Count=11, PressFit=No, Sense=No, SMD=Yes, Socket=No, Status=None
J2: library part 3M_N2530-6002RB, "Connector 30 Male", Manufacturer=3M, Manufacturer Part Number=N2530-6002RB, Author="CERN DEM JLC", ComponentHeight=10.03mm, Component Type=Standard, CreateDate=11.02.2009, Family="Header 30", HelpURL=\\cern.ch\dfs\Applications\Altium\Datasheets\3M_N2530-6002RB.pdf, LatestRevisionDate=11.08.2009, Mounted=Yes, Part Description="30 Contacts - Straight .100'' x .100'' Low Profile Four-Wall Header, 2500 Series", Part Number=3M_N2530-6002RB, Pin Count=30, PressFit=No, Sense=No, SMD=No, Socket=No, Status=None
J3: library part 3M_N2526-6002RB, "Connector 26 Male", Manufacturer=3M, Manufacturer Part Number=N2526-6002RB, Author="CERN DEM JLC", ComponentHeight=10.03mm, Component Type=Standard, CreateDate=11.02.2009, Family="Header 26", HelpURL=\\cern.ch\dfs\Applications\Altium\Datasheets\3M_N2526-6002RB.pdf, LatestRevisionDate=11.08.2009, Mounted=Yes, Part Description="26 Contacts - Straight .100'' x .100'' Low Profile Four-Wall Header, 2500 Series", Part Number=3M_N2526-6002RB, Pin Count=26, PressFit=No, Sense=No, SMD=No, Socket=No, Status=None
J4: library part 3M_N2534-6002RB, "Connector 34 Male", Manufacturer=3M, Manufacturer Part Number=N2534-6002RB, Author="CERN DEM JLC", ComponentHeight=10.03mm, Component Type=Standard, CreateDate=11.02.2009, Family="Header 34", HelpURL=\\cern.ch\dfs\Applications\Altium\Datasheets\3M_N2534-6002RB.pdf, LatestRevisionDate=11.08.2009, Mounted=Yes, Part Description="34 Contacts - Straight .100'' x .100'' Low Profile Four-Wall Header, 2500 Series", Part Number=3M_N2534-6002RB, Pin Count=34, PressFit=No, Sense=No, SMD=No, Socket=No, Status=None
J5 J6: library part AMPHENOL_919-383J-51A, Manufacturer=AMPHENOL, Manufacturer Part Number=919-383J-51A, Author="CERN DEM BC", ComponentHeight=6mm, Component Type=Standard, CreateDate=31.01.2019, Family=MCX, HelpURL=\\cern.ch\dfs\Applications\Altium\Datasheets\AMPHENOL_919-383J-51A.pdf, LatestRevisionDate=31.01.2019, Mounted=Yes, Part Description="50 Ohm, RF Connector, MCX Right Angle PCB Receptacle Jack", Part Number=AMPHENOL_919-383J-51A, Pin Count=5, PressFit=No, Sense=No, SMD=No, Socket=No, Status=None
J7: library part BELFUSE_0826-1X1T-80-F, "MagJack 1000BaseT, PoE+, 1X1, OG/Y, Tab Up, RoHS", Manufacturer="BEL MAGNETIC SOLUTIONS", Manufacturer Part Number=0826-1X1T-80-F, Author="CERN DEM JLC", Component Type=Standard, ComponentHeight=13.61mm, CreateDate=30.04.2014, Family=RJ45, HelpURL=\\cern.ch\dfs\Applications\Altium\Datasheets\BEL_0826-1X1T-80-F.pdf, LatestRevisionDate=20.09.2018, Mounted=Yes, Part Description="1 Port, Orange Green/Yellow LEDs, RJ45 1000BaseT, PoE, Gigabit MagJack® Connector Module", Part Number=BELFUSE_0826-1X1T-80-F, Pin Count=20, PressFit=No, Sense=No, SMD=No, Socket=No, Status=None
J8: library part ATTEND_112A-TAAR-R03, "Connector MicroSD 8 Pin + Switch", Manufacturer=ATTEND, Manufacturer Part Number=112A-TAAR-R03, Author="CERN DEM JMW", ComponentHeight=1.9mm, Component Type=Standard, CreateDate=07-Jul-15, Family=microSD, HelpURL=\\cern.ch\dfs\Applications\Altium\Datasheets\ATTEND_112A-TAAR-R03.pdf, LatestRevisionDate=07-Jul-15, Mounted=Yes, Part Description="MicroSD Socket, Push-Push Type", Part Number=ATTEND_112A-TAAR-R03, Pin Count=10, PressFit=No, Sense=No, SMD=Yes, Socket=No, Status=None
J9: library part CON_DC_5A_THT_RA, "24V /3. 5A, 2.1mm Diameter Pin, SMD DC Power Supply Connector With  Break Contact", Manufacturer=SWITCHCRAFT, Manufacturer Part Number=L712RA, Part Number=SWITCHCRAFT_L712RA, Author=GK, ComponentHeight=11mm, Component Type=Standard, CreateDate=15.02.2011, Family=Jack, HelpURL=\\cern.ch\dfs\Applications\Altium\Datasheets\LUMBERG_161314.pdf, LatestRevisionDate=20.07.2011, Mounted=Yes, Part Description="12V/5A, 2.5mm Diameter Pin, THT DC Power Supply Connector With  Break Contact", Pin Count=3, PressFit=No, Sense=No, SMD=No, Socket=No, Status=None
J10: library part CON_CRIMP_4.2mm_RA_4, "4.2mm cripm terminal header"
J11: library part SAMTEC_MMCX-J-P-H-ST-TH1, Manufacturer=SAMTEC, Manufacturer Part Number=MMCX-J-P-H-ST-TH1, Author="CERN DEM JLC", Component Type=Standard, ComponentHeight=4.35mm, CreateDate=05.12.2012, HelpURL=\\cern.ch\dfs\Applications\Altium\Datasheets\SAMTEC_MMCX-J-P-H-ST-TH1.pdf, LatestRevisionDate=05.12.2012, Mounted=Yes, Part Description="Straight Through-hole 50 Ohm Micro Mini RF Jack, MMCX Series", Part Number=SAMTEC_MMCX-J-P-H-ST-TH1, Pin Count=2, PressFit=No, Sense=No, SMD=No, Socket=No, Status=None
J15 J18 J19 J20: library part CON_SMA_DELOCK_65848, "50 Ohm Through Hole SMA Right Angle PCB Jack", Manufacturer=DELOCK, Manufacturer Part Number="5848 (4043619658480)", Part Number=DELOCK_65848, Author=GK, Component Type=Standard, ComponentHeight=12.5, CreateDate=13.05.2019, Family=SMA, HelpURL=\\cern.ch\dfs\Applications\Altium\Datasheets\AMPHENOL_132203-16.pdf, LatestRevisionDate=13.05.2019, Mounted=Yes, Part Description="50 Ohm Through Hole SMA Right Angle PCB Jack", Pin Count=5, PressFit=No, Sense=No, SMD=No, Socket=No, Status=None
J16: library part 3M_N2516-6002RB, "Connector 16 Male", Manufacturer=3M, Manufacturer Part Number=N2516-6002RB, Author="CERN DEM JLC", ComponentHeight=10.03mm, Component Type=Standard, CreateDate=11.02.2009, Family="Header 16", HelpURL=\\cern.ch\dfs\Applications\Altium\Datasheets\3M_N2516-6002RB.pdf, LatestRevisionDate=11.08.2009, Mounted=Yes, Part Description="16 Contacts - Straight .100'' x .100'' Low Profile Four-Wall Header, 2500 Series", Part Number=3M_N2516-6002RB, Pin Count=16, PressFit=No, Sense=No, SMD=No, Socket=No, Status=None
J17: library part MOLEX_87832-1420, "Connector 14 Male", Manufacturer=MOLEX, Manufacturer Part Number=87832-1420, Author="CERN DEM JLC", ComponentHeight=7.6mm, Component Type=Standard, CreateDate=09-Sep-08, Family=Milli-Grid™, HelpURL=\\cern.ch\dfs\Applications\Altium\Datasheets\MOLEX_87832-1420.pdf, LatestRevisionDate=09-Sep-08, Mounted=Yes, Part Description="2.00mm (.079\") Pitch Milli-Grid™ Header, Surface Mount, Vertical, Shrouded, 14 Circuits,with Locking Windows and Centre Polarization Slot, PCB Locator", Part Number=MOLEX_87832-1420, Pin Count=14, PressFit=No, Sense=No, SMD=Yes, Socket=No, Status=None
JB1: library part 25285, "Samtec Razor Beam REF-189016-02, LF-04.0, 100 Pins, für alle 4x5 SoMs", AN=25285, Mixed=SMT, Part Number=LSHM-150-04.0-L-DV-A-S-K-TR, Trenz-Article-Number=23838, Trenz-Stock=Yes
JB2: library part 25286, "Samtec Razor Beam REF-189017-02, LF-04.0, 60 Pins, für alle 4x5 SoMs", AN=25286, Mixed=SMT, Part Number=LSHM-150-04.0-L-DV-A-S-K-TR, Trenz-Article-Number=23838, Trenz-Stock=Yes
JB3: library part 25287, "Samtec Razor Beam REF-189017-02, LF-04.0, 60 Pins, für alle 4x5 SoMs", AN=25287, Mixed=SMT, Part Number=LSHM-130-04.0-L-DV-A-S-K-TR, Trenz-Article-Number=24903, Trenz-Stock=Yes
L1: library part IND0504_WURTH_7442335600, "Inductor Common Mode", Case=0504, Manufacturer="WURTH ELEKTRONIK", Manufacturer Part Number=7442335600, Power=600mA, Resistance=0.22R, Tolerance=±25%, Author="CERN DEM BC", ComponentHeight=1.1mm, Component Type=Standard, CreateDate=21-Oct-19, HelpURL=\\cern.ch\dfs\Applications\Altium\Datasheets\IND0504_WURTH_7442335600.pdf, LatestRevisionDate=21-Oct-19, Mounted=Yes, Part Description="Common Mode SMD Line Filter (WE-CNSW Series)", Part Number=IND0504_WURTH_7442335600, Pin Count=4, Sense=No, SMD=Yes, Socket=No, Status=None
L2A L2B L3 L4: library part IND_TDK_ACM2012-361-2P, "Inductor Common Mode", Manufacturer=TDK, Manufacturer Part Number=ACM2012-361-2P, Power=220mA, Resistance=0R5, Author="CERN DEM BC", ComponentHeight=1.3mm, Component Type=Standard, CreateDate=07/07/2020, HelpURL=\\cern.ch\dfs\Applications\Altium\Datasheets\IND_TDK_ACM2012.pdf, LatestRevisionDate=07/07/2020, Mounted=Yes, Part Description="Common Mode Filters For High-Speed Differential Signal Line, TDK ACM2012 Series", Part Number=IND_TDK_ACM2012-361-2P, Pin Count=2, Sense=No, SMD=Yes, Socket=No, Status=None
L5: library part IND_10UH_20%_TDK_VLCF5020-1, "Inductor With Core", Manufacturer=TDK, Manufacturer Part Number=VLCF5020T-100M1R1-1, Power=1.5A, Resistance=0.198R, Tolerance=±20%, Author="CERN DEM JLC", Component Type=Standard, ComponentHeight=2mm, CreateDate=10.07.2014, HelpURL=\\cern.ch\dfs\Applications\Altium\Datasheets\IND_TDK_VLCF.pdf, LatestRevisionDate=10.07.2014, Mounted=Yes, Part Description="SMD Inductor for Power Circuits (Wound/STD , Magnetic Shielded), VLCF series", Part Number=IND_10UH_20%_TDK_VLCF5020-1, Pin Count=2, Sense=No, SMD=Yes, Socket=No
L6: library part IND2525_3.3UH_20%_VISHAY_IHLP-2525CZ-01, "Inductor With Core", Case=2525, Manufacturer="VISHAY DALE", Manufacturer Part Number=IHLP2525CZER3R3M01, Power=6A, Resistance=0.028R, Tolerance=±20%, Author="CERN DEM MR", Component Type=Standard, ComponentHeight=3mm, CreateDate=29.06.2017, HelpURL=\\cern.ch\dfs\Applications\Altium\Datasheets\IND2525_VISHAY_IHLP-2525CZ-01.pdf, LatestRevisionDate=29.06.2017, Mounted=Yes, Part Description="Low Profile, High Current IHLP® Inductor", Part Number=IND2525_3.3UH_20%_VISHAY_IHLP-2525CZ-01, Pin Count=2, Sense=No, SMD=Yes, Socket=No
L7 L15 L16: library part IND_3.3UH_30%_WURTH_WE-TPC_744043003, "Inductor With Core", Manufacturer="WURTH ELEKTRONIK", Manufacturer Part Number=744043003, Power=2.15A, Resistance=0.03R, Tolerance=±30%, Author="CERN DEM JLC", Component Type=Standard, ComponentHeight=3mm, CreateDate=12.07.2011, HelpURL=\\cern.ch\dfs\Applications\Altium\Datasheets\IND_WURTH_WE-TPC_744043003.pdf, LatestRevisionDate=24.01.2012, Mounted=Yes, Part Description="Shielded Tiny Power Inductor (WE-TPC Serie)", Part Number=IND_3.3UH_30%_WURTH_WE-TPC_744043003, Pin Count=2, Sense=No, SMD=Yes, Socket=No
L8 L10 L11 L12 L13 L14: library part IND_10UH_10%_MURATA-PS_8400, "Inductor With Core", Manufacturer="MURATA POWER SOLUTIONS", Manufacturer Part Number=84103C, Power=950mA, Resistance=0.24R, Tolerance=±10%, Author="CERN DEM JLC", ComponentHeight=2.9mm, Component Type=Standard, CreateDate=02.07.2012, HelpURL=\\cern.ch\dfs\Applications\Altium\Datasheets\IND_MURATA-PS_8400.pdf, LatestRevisionDate=02.07.2012, Mounted=Yes, Part Description="Miniature Surface Mount Power Inductor (8400 Serie)", Part Number=IND_10UH_10%_MURATA-PS_8400, Pin Count=2, Sense=No, SMD=Yes, Socket=No, Status=None
L9: library part IND_1MH_50%_WURTH_WE-SL2-744222, "Inductor Common Mode", Manufacturer="WURTH ELEKTRONIK", Manufacturer Part Number=744222, Power=800mA, Resistance=0.31R, Tolerance=±50%, Author="CERN DEM JLC", ComponentHeight=5.3mm, Component Type=Standard, CreateDate=04.06.2012, HelpURL=\\cern.ch\dfs\Applications\Altium\Datasheets\IND_WURTH_WE-SL2_744222.pdf, LatestRevisionDate=15.10.2012, Mounted=Yes, Part Description="Common Mode SMD Line Filter (WE-SL2 Series)", Part Number=IND_1MH_50%_WURTH_WE-SL2-744222, Pin Count=4, Sense=No, SMD=Yes, Socket=No, Status=None
L17 L18 L19 L20 L21 L22: library part IND0603_TDK_MPZ1608S331ATD25, Case=0603, Manufacturer=TDK, Manufacturer Part Number=MPZ1608S331ATD25, Power=1.7A, Resistance=0.08R, Tolerance=±25%, Author="CERN DEM JLC", Component Type=Standard, ComponentHeight=0.8mm, CreateDate=10.01.2018, HelpURL=\\cern.ch\dfs\Applications\Altium\Datasheets\IND0603_TDK_MPZ1608_Automotive.pdf, LatestRevisionDate=25.10.2018, Mounted=Yes, Part Description="SMT Chip Bead for Power Line (For Automotive Grade)", Part Number=IND0603_TDK_MPZ1608S331ATD25, Pin Count=2, Sense=No, SMD=Yes, Socket=No